# Altium PCB STM32 ONBOARD.PcbDoc (part 1 of 2)
Units mm, origin at the board's own origin, x right, y up, seen from the top; angles counter-clockwise.
Board outline 80.78 x 83.12 mm, 2 copper layers (Top Layer, Bottom Layer); 65 components, 57 nets, 280 pads, 99 vias.
Unrouted connection lines stored in the file: 49.
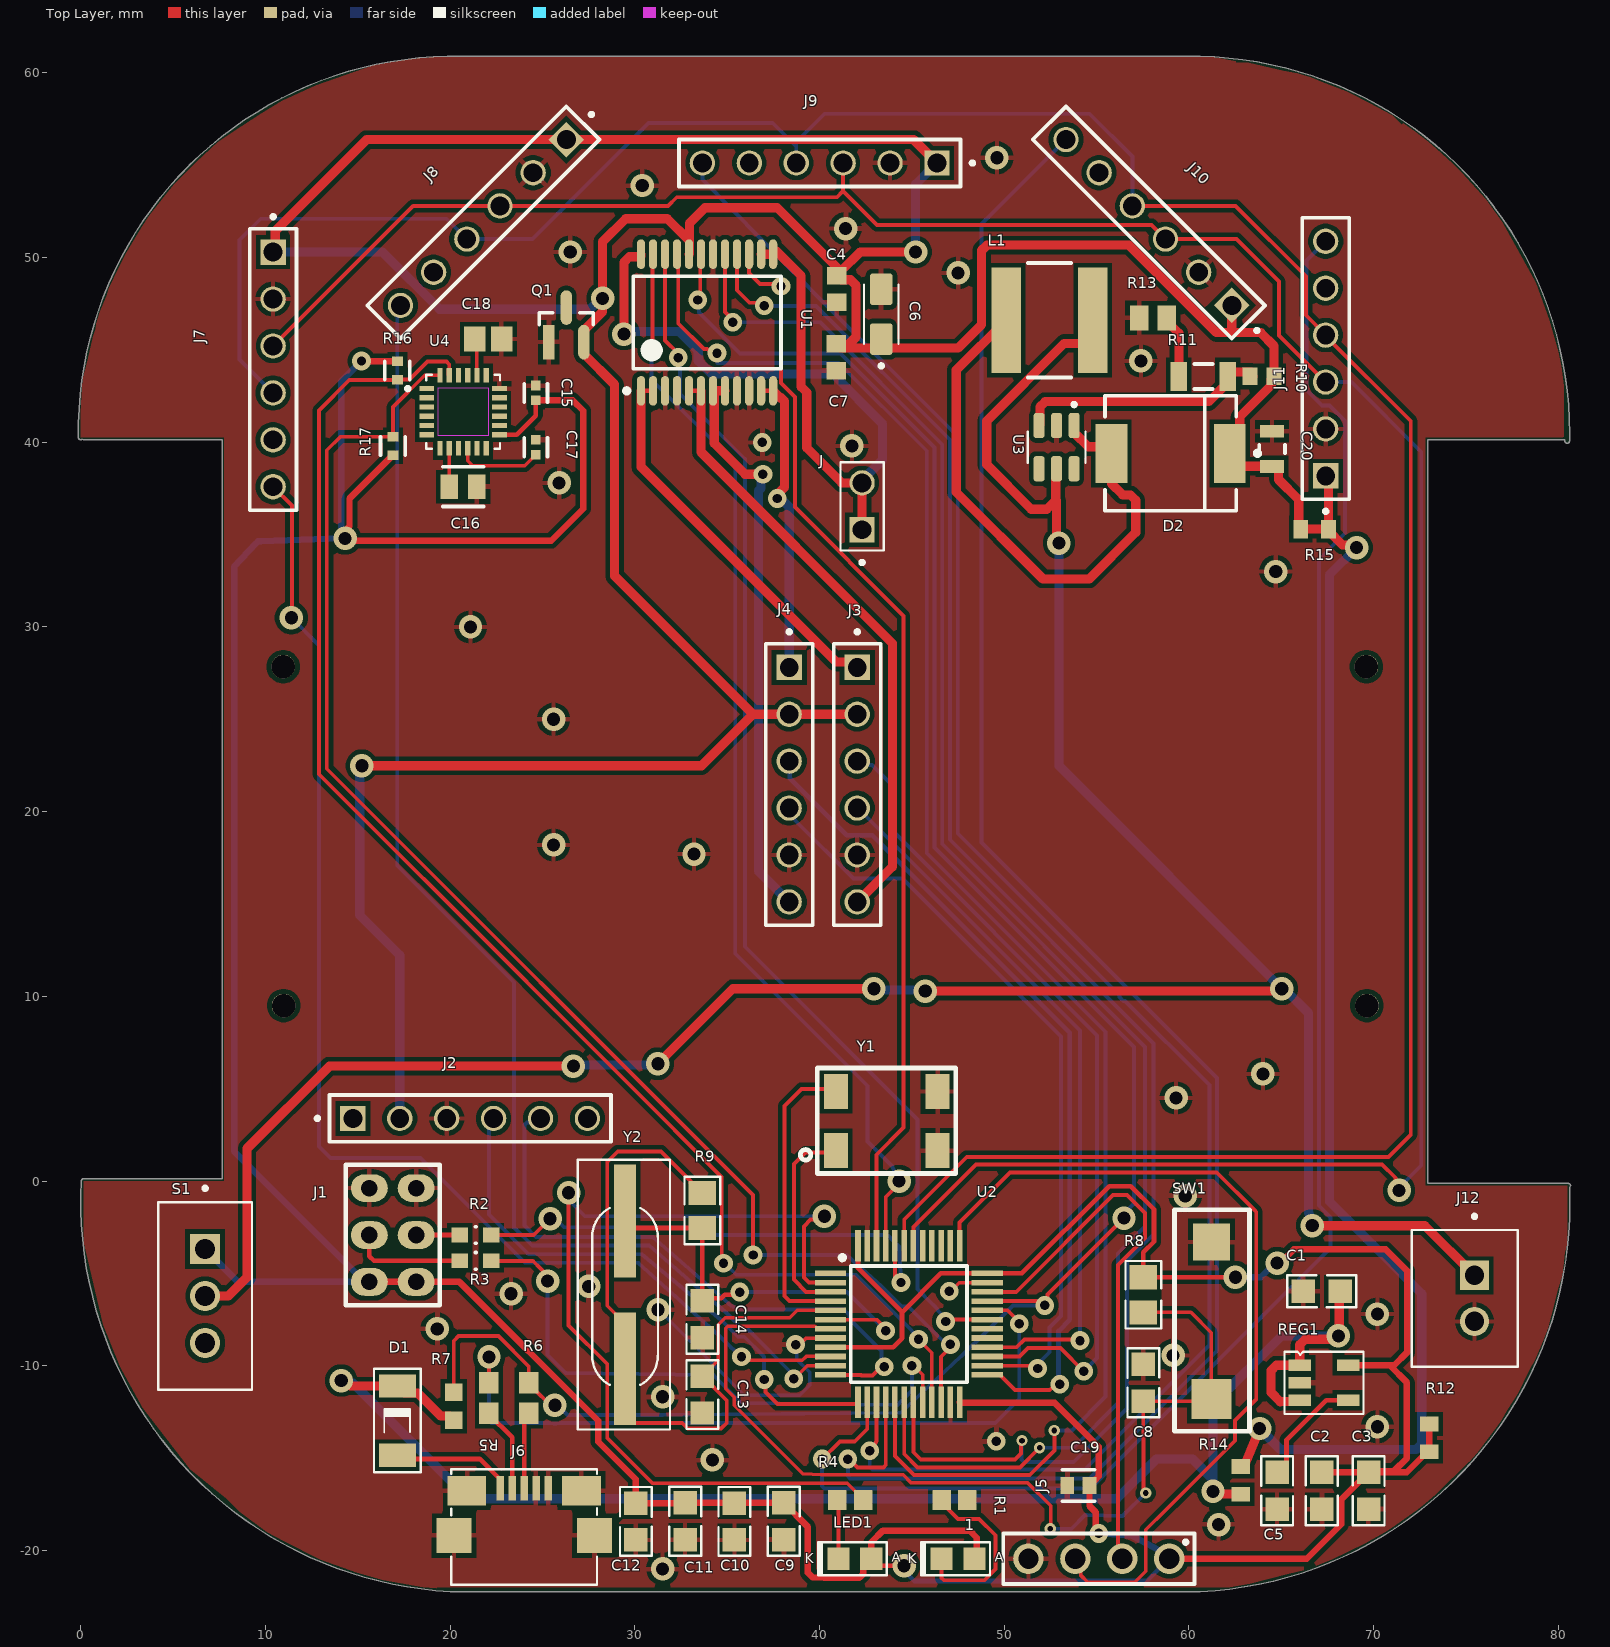
[diagram p0: Top Layer view]
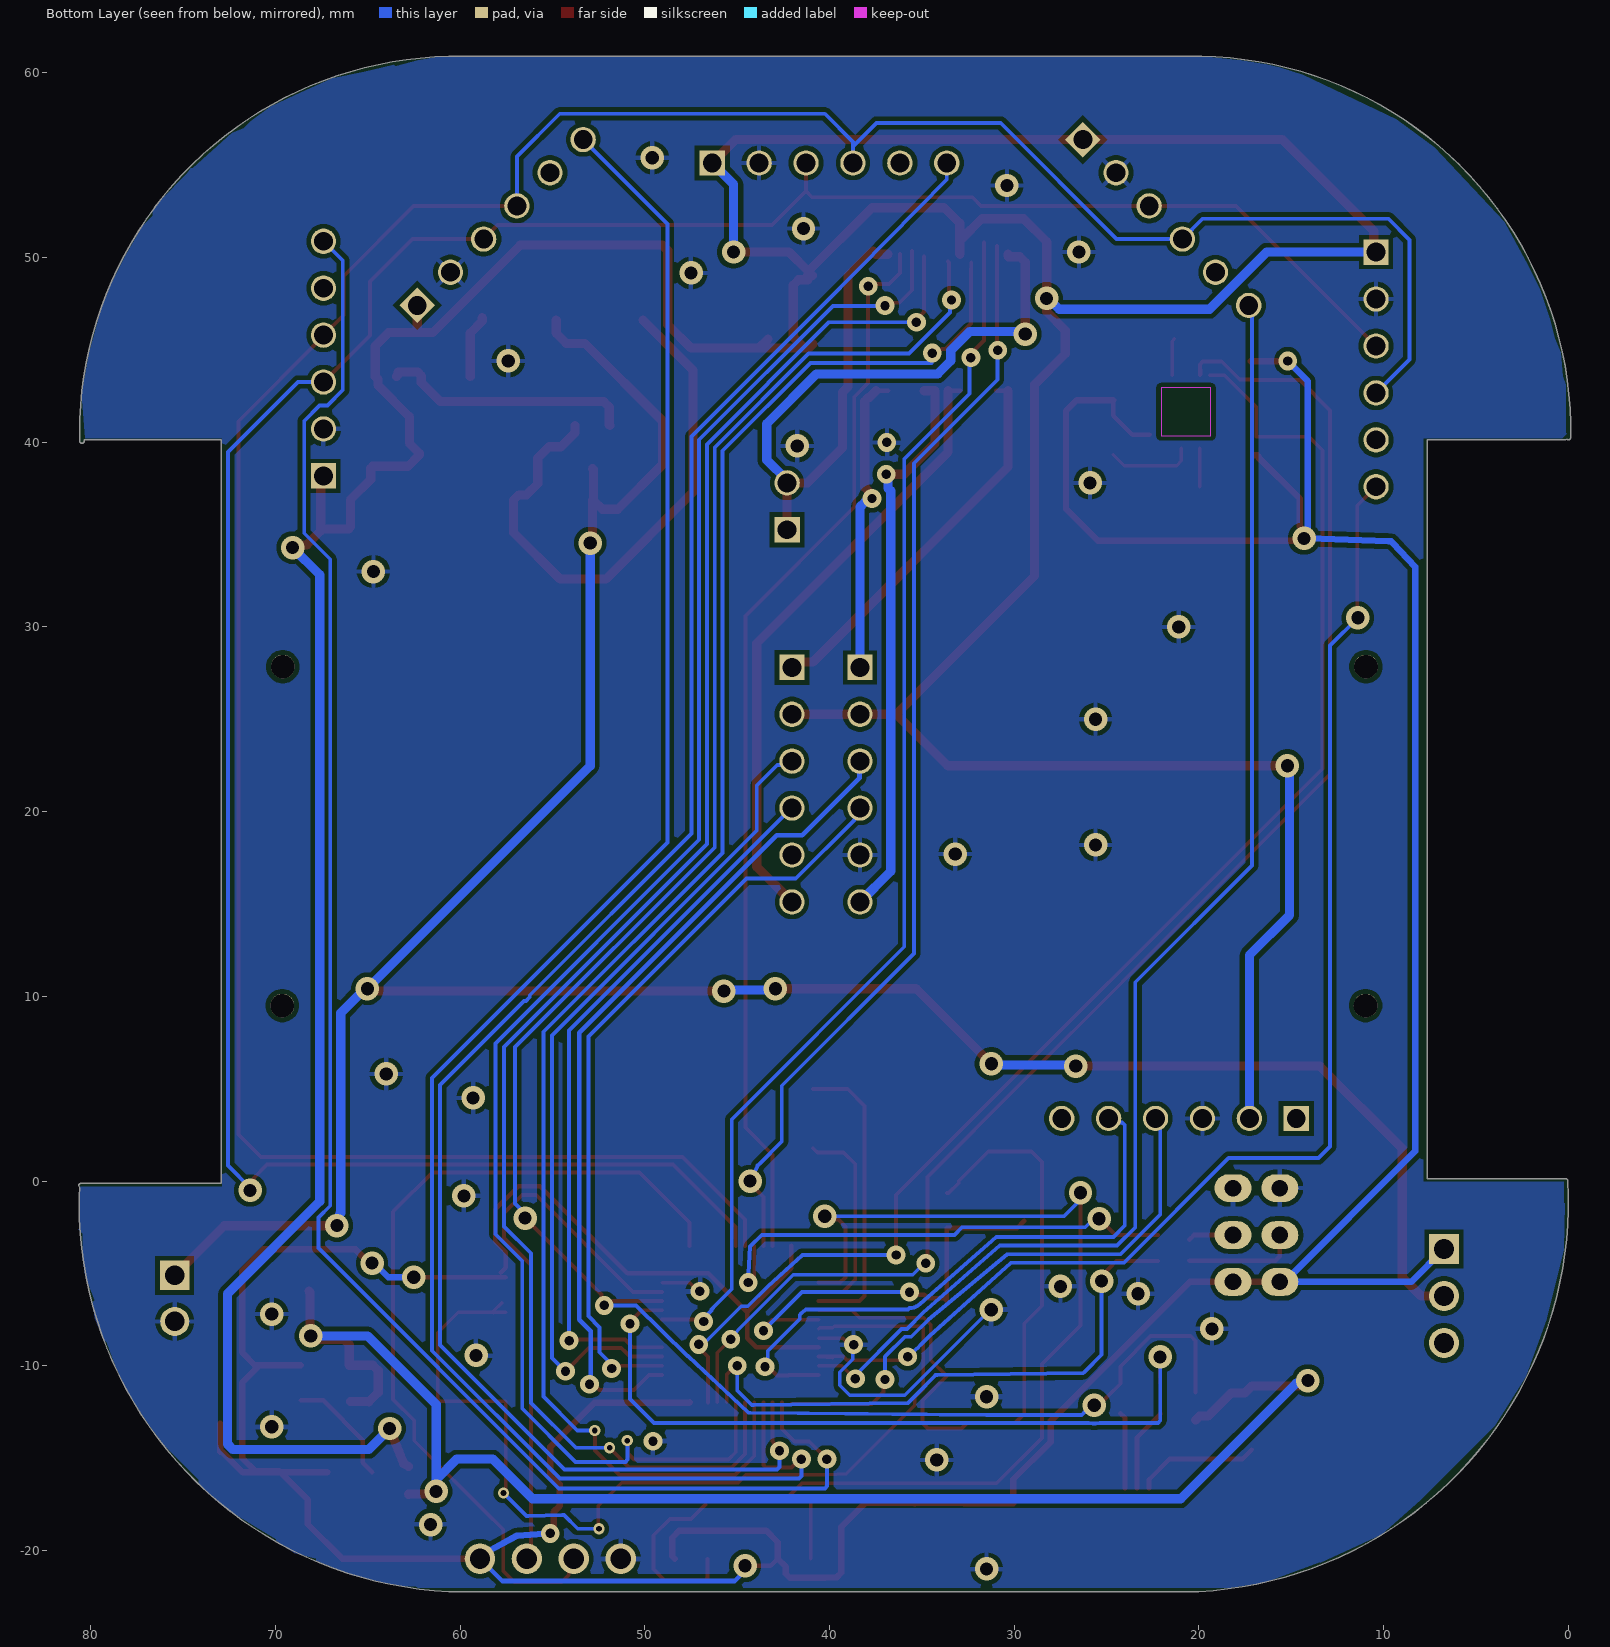
[diagram p1: Bottom Layer view, seen from below]
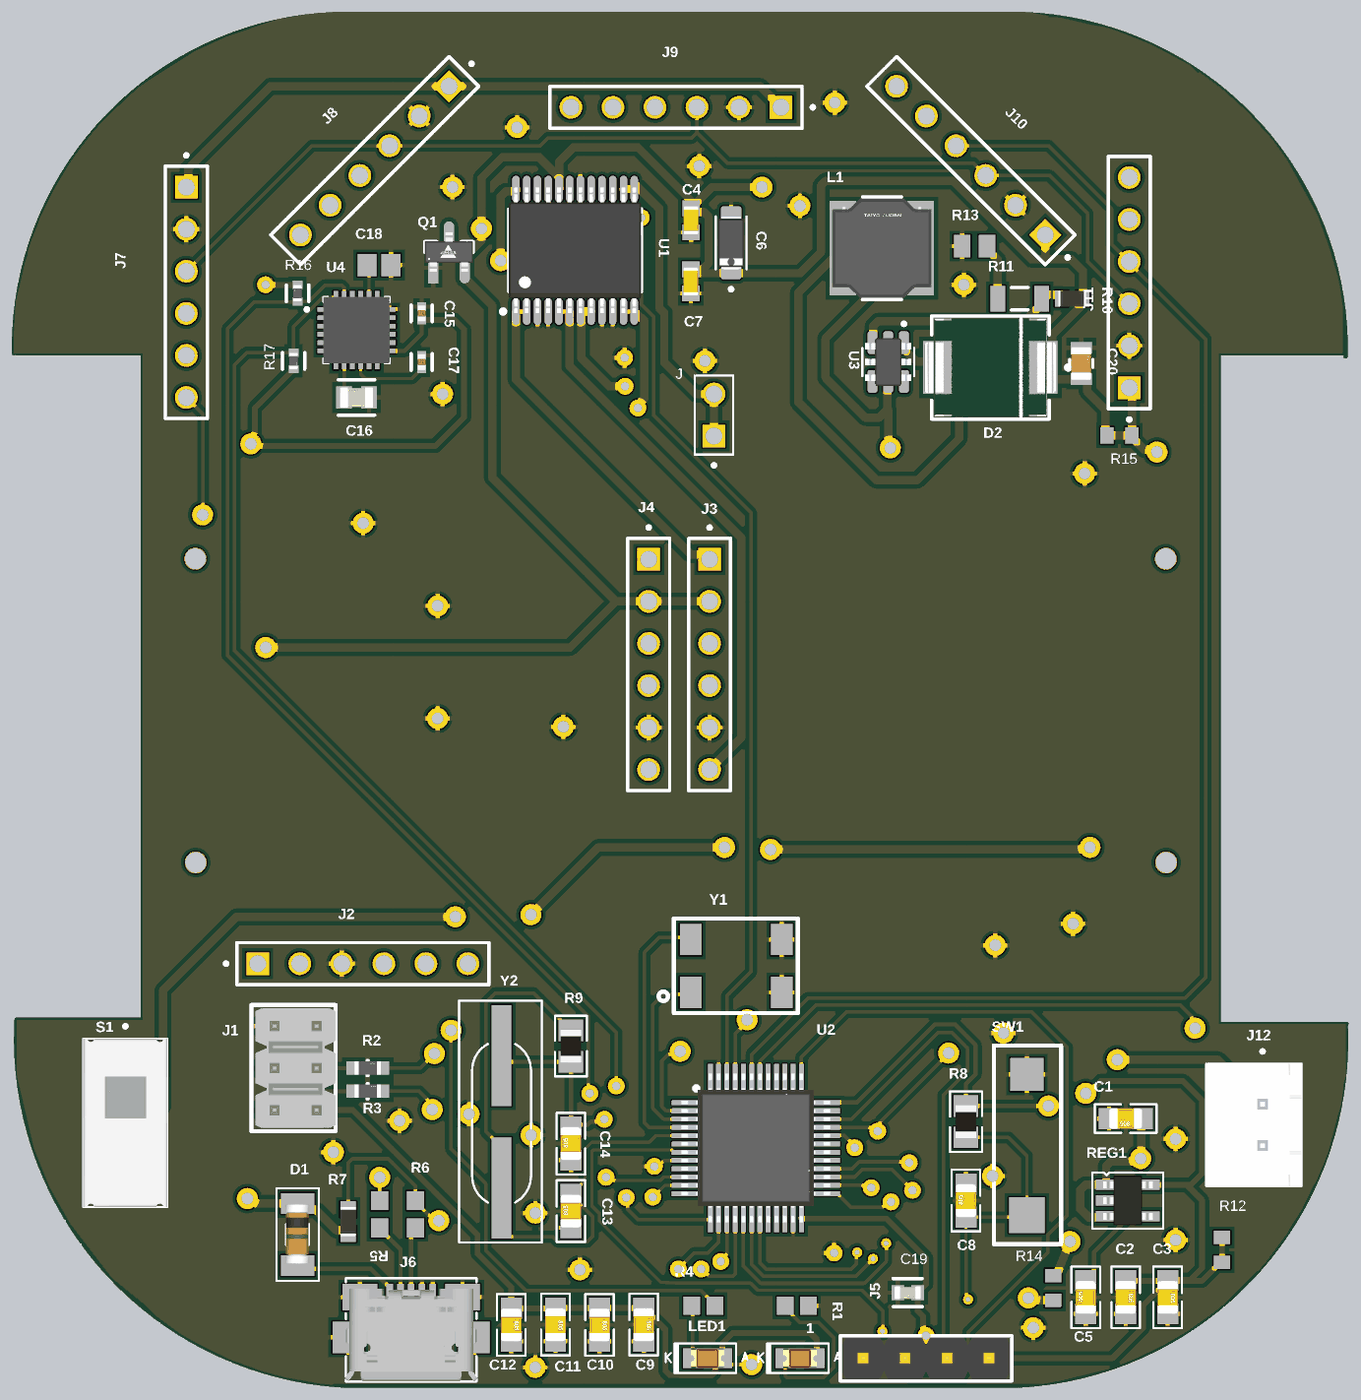
[diagram p3: 3D render of the assembled board from above, using the file's embedded part models]

## Layer stack, top to bottom
Top Solder: solder mask 0.0102, Solder Resist, Dk 3.5
Top Layer: signal copper 0.0356
Dielectric 1: dielectric 0.32, FR-4, Dk 4.8
Bottom Layer: signal copper 0.0356
Bottom Solder: solder mask 0.0102, Solder Resist, Dk 3.5

## Board outline
0.029,0.006 cw(c0.157,0) 0.157,0.127 7.649,0.127 7.649,40.131 0.157,40.131 0.078,40.158 cw(c0,40.259) -0.127,40.257 cw(c20.186,40.576) 19.866,60.889 19.868,60.889 20.024,60.889 20.034,60.889 60.609,60.889 60.611,60.889 cw(c60.199,40.484) 80.608,40.484 cw(c60.199,40.484) 80.607,40.256 cw(c60.199,40.484) 80.604,40.072 cw(c80.477,40.075) 80.349,40.077 80.35,40.13 72.928,40.13 72.928,-0.127 80.53,-0.127 cw(c80.53,-0.254) 80.657,-0.254 80.609,-0.355 cw(c59.62,-1.242) 80.627,-1.242 cw(c59.62,-1.242) 60.615,-22.226 60.609,-22.226 20.025,-22.226 20.018,-22.226 cw(c21.14,-1.115)

## Design rules (kind name [scope] priority, off if disabled: settings)
Clearance [All] p1: gap=0.254 ignorepadtopadclearanceinfootprint=FALSE except(0.1: Arc-SMDPad Track-SMDPad SMDPad-SMDPad; 0.21: Arc-Arc Arc-Track Track-Track)
HoleSize [IsVia] p1: absolutevalues=TRUE maxlimit=3 minlimit=0 maxpercent=80.000 minpercent=20.000
PolygonConnect [All] p1: connectstyle=Relief reliefconductorwidth=0.254 reliefentries=4 polygonreliefangle="90 Angle" airgapwidth=0.254
RoutingVias [All] p1: holewidth=0.711 width=1.27 viastyle="Through Hole" minholewidth=0 minwidth=0 maxholewidth=2 maxwidth=3
SolderMaskExpansion [All] p1: expansion=0.102 istentingtop=FALSE
SupplyNets "Schematic Supply Nets_4" [InNet('+3V3')] p1: voltage=0.000
SupplyNets "Schematic Supply Nets" [InNet('GND')] p2: voltage=0.000
Width Width_1 [InNet('AO1')] p1: maxlimit=0.7 minlimit=0.254 preferedwidth=0.5
Width Width_6 [InNet('AO2')] p2: maxlimit=0.7 minlimit=0.254 preferedwidth=0.5
Width Width_5 [InNet('BO1')] p3: maxlimit=0.7 minlimit=0.254 preferedwidth=0.5
Width Width_4 [InNet('BO2')] p4: maxlimit=0.7 minlimit=0.254 preferedwidth=0.5
Width Width_3 [InNet('+3V3')] p5: maxlimit=0.7 minlimit=0.254 preferedwidth=0.35
Width Width_2 [InNet('5V')] p6: maxlimit=0.7 minlimit=0.254 preferedwidth=0.5
Width [All] p7: maxlimit=0.5 minlimit=0.19 preferedwidth=0.21
29 further rules are at their usual default settings.

## Components (designator, comment, footprint, x,y, rotation, side; value= is the part's Value field where it differs from the comment)
1 "RED LED" LED_0805 47.498,-20.447 r0 top
C1 "0.1uF" CAP_0805 67.183,-5.969 r180 top
C2 "0.1uF" CAP_0805 67.183,-16.764 r270 top
C3 "0.1uF" CAP_0805 69.723,-16.764 r270 top
C4 "GRM188R71H104KA93D" CAPC1608X90X35ML10T15 40.921,48.296 r90 top
C5 "22pF" CAP_0805 64.77,-16.764 r90 top
C6 "T491A106K016AG" CAPMP3216X180N 43.339,46.933 r90 top
C7 "0,1 uf" CAPC1608X90X35ML10T15 40.9,44.6 r90 top
C8 "0.1uF" CAP_0805 57.531,-10.922 r90 top
C9 "0.1uF" CAP_0805 38.055,-18.415 r270 top
C10 "0.1uF" CAP_0805 35.388,-18.431 r270 top
C11 "0.1uF" CAP_0805 32.721,-18.415 r270 top
C12 "0.1uF" CAP_0805 30.054,-18.431 r270 top
C13 "22pF" CAP_0805 33.655,-11.557 r90 top
C14 "22pF" CAP_0805 33.655,-7.477 r90 top
C15 "0.1uf" FP-C0402-BB-MFG 24.638,42.672 r90 top value="0.10 μF"
C16 "10nF" FP-C0805C-DN-MFG 20.701,37.592 r0 top value="10,000 pF"
C17 "0.1uf" FP-C0402-BB-MFG 24.638,39.732 r90 top value="0.10 μF"
C18 "2.2nF" CAPC2013X94X50LL20T25 22.061,45.593 r0 top
C19 "C0603C104K5RACTU" FP-C0603C-CF-MFG 54.013,-16.482 r180 top value="0.10 μF"
C20 "22uF" FP-GRM21B-0_15-MFG 64.496,39.646 r90 top
D1 "Zener3" DIO_SOD80C 17.145,-12.97 r270 top
D2 "SS34-E3/57T" FP-95402-MFG 59.005,39.4 r180 top
J "3-644456-2" TE_3-644456-2 42.3,35.26 r90 top
J1 "2X3 Berg Strip" CON6_100_59D78_TH_ST_Duplicate 18.161,-5.461 r90 top
J2 "TOF 2" SAMTEC_MTSW-106-22-S-S-360 21.082,3.391 r180 top
J3 "RIGHT MOTOR" SAMTEC_MTSW-106-22-S-S-360 42.037,21.463 r90 top
J4 "LEFT MOTOR" SAMTEC_MTSW-106-22-S-S-360 38.354,21.463 r90 top
J5 "6130XX11121_61300411121" 61300411121 55.118,-20.447 r180 top
J6 "MICRO USB2.0" CON_10118192-0001LF_SMD 24.003,-17.907 r0 top
J7 "TOF 1" SAMTEC_MTSW-106-22-S-S-360 10.414,43.942 r90 top
J8 "TOF 2" SAMTEC_MTSW-106-22-S-S-360 21.799,51.898 r45 top
J9 "TOF 3" SAMTEC_MTSW-106-22-S-S-360 40.005,55.118 r0 top
J10 "TOF 4" SAMTEC_MTSW-106-22-S-S-360 57.83,51.898 r315 top
J11 "TOF 5" SAMTEC_MTSW-106-22-S-S-360 67.4,44.53 r270 top
J12 "B2B-XH-A(LF)(SN)" JST_B2B-XH-A(LF)(SN) 74.93,-6.35 r90 top
L1 "22uH" FP-NR6045-MFG 52.451,46.609 r0 top
LED1 "RED LED" LED_0805 41.91,-20.447 r0 top
Q1 "SI2337DS-T1-GE3" FP-S-03946-IPC_A 26.289,46.355 r90 top
R1 "ERA3AEB511V" RESC1608X55X30ML20T20 47.306,-17.272 r0 top
R2 "RC0603FR-07100KL" FP-RC0603-0_55-MFG 21.375,-2.921 r0 top
R3 "RC0603FR-07100KL" FP-RC0603-0_55-MFG 21.375,-4.318 r0 top
R4 "ERA3AEB511V" RESC1608X55X30ML20T20 41.656,-17.272 r0 top
R5 "20R,0603" RESC1609X55X30ML10T20 22.098,-11.748 r270 top
R6 "20R,0603" RESC1609X55X30ML10T20 24.257,-11.747 r270 top
R7 "ERJ-3EKF4701V" RESC1608X55X30NL15T15 20.193,-12.192 r90 top
R8 "10K" RES_0805 57.531,-6.157 r270 top
R9 "10Mohm" RES_0805 33.655,-1.59 r90 top
R10 "10K" RESC1609X50X30NL8T20 63.951,43.561 r0 top
R11 "1K" RESC3216X70X50LL05T20 60.778,43.561 r0 top
R12 "0R" RESC1608X55X25ML10T15 73,-13.9 r90 top
R13 "330" RESC2013X60X40LL20T25 58.051,46.736 r0 top
R14 "0R" RESC1608X55X25ML10T15 62.8,-16.2 r90 top
R15 "0R" RESC1608X55X25ML10T15 66.8,35.3 r0 top
R16 "4.7R" FP-RC0402-0_4-MFG 17.137,43.887 r90 top
R17 "4.7R" FP-RC0402-0_4-MFG 16.9,39.8 r270 top
REG1 "RT9193-33GB" SOT23-5 67.31,-10.922 r270 top
S1 "500ASSP1M2QE" SW_500ASSP1M2QE 6.731,-6.223 r270 top
SW1 "TACT SWITCH" SW_342_SMD 61.214,-3.302 r90 top
U1 "TB6612FNG" TOSH-SSOP-24_M 33.909,46.482 r90 top
U2 "STM32F103C8T6" LQFP-48_19.6_393_58X11_SMD 44.831,-7.747 r0 top
U3 "MT3608" SOT95P280X145-6N 52.832,39.735 r270 top
U4 "MPU-6050" QFN50P400X400X95-24N 20.701,41.656 r0 top
Y1 "32.768KHz" "XTAL_MC-405 32.7680K-G3" 40.894,4.851 r0 top
Y2 "8MHz" XTAL_314_240X47_SMD 29.464,-10.16 r90 top

## Footprints (in the part's own frame and the unit in brackets; to place one, negate y for a bottom-side part, rotate by r counter-clockwise, add the part's x,y. Pads: shape width x height; smd on the part's side, far side on the other; paste and mask are expansions set on the pad)
61300411121 [mm]
  round 1.65 hole 1.1: 1(-3.81,0) 2(-1.27,0) 3(1.27,0) 4(3.81,0)
  silkscreen extent -5.18,-1.37 5.18,1.37, body extent -5.08,-1.27 5.08,1.27, height 7.27
CAP_0805 [mm] "Ceramic Capacitor"
  rect 1.27x1.27 smd mask+0.076: 1(-1,0) 2(1,0)
  silkscreen extent -1.86,-0.86 1.86,0.86, body extent -1,-0.62 1,0.63, height 0.78
CAPC1608X90X35ML10T15 [mm] "Chip Capacitor, 2-Leads, Body 1.7x0.9mm, IPC Low Density"
  rect 0.95x1.05 smd: 1(-0.725,0) 2(0.725,0)
  body extent -0.85,-0.45 0.85,0.45, height 0.9
CAPC2013X94X50LL20T25 [mm] "Chip Capacitor, 2-Leads, Body 2.01x1.25mm, IPC High Density"
  rect 1.15x1.35 smd: 1(-0.725,0) 2(0.725,0)
  body extent -1.1,-0.72 1.1,0.72, height 0.94
CAPMP3216X180N [mm]
  rrect25% 1.71x1.23 smd: 1(-1.35,0) 2(1.35,0)
  silkscreen extent -2.9,-0.94 1.6,0.93, body extent -1.6,-0.8 1.6,0.8, height 1.8
CON6_100_59D78_TH_ST_Duplicate [mm] "Berg strip"
  oval 1.5x2 hole 0.9: 1(0,0) 2(0,2.54) 3(2.54,0) 4(2.54,2.54) 5(5.08,0) 6(5.08,2.54)
  silkscreen extent -1.27,-1.27 6.35,3.81, body extent -1.07,-1.27 6.15,3.56, height 8.18
CON_10118192-0001LF_SMD [mm] "USB2.0 MICRO"
  rect 0.4x1.35 smd: 1(-1.3,1.275) 2(-0.65,1.275) 3(0,1.275) 4(0.65,1.275) 5(1.3,1.275)
  rect 2.1x1.6 smd: 6(-3.1,1.15) 7(3.1,1.15)
  rect 1.9x1.9 smd: 8(-3.8,-1.275) 9(3.8,-1.275)
  silkscreen extent -3.95,-3.94 3.95,2.3, body extent -4.04,-3.94 4.04,1.66, height 2.81
DIO_SOD80C [mm] "Voltage regulator diodes"
  rect 1.25x2 smd: A(1.875,0) K(-1.875,0)
  silkscreen extent -2.8,-1.27 2.79,1.27, body extent -1.82,-0.78 1.77,0.72, height 1.5
FP-95402-MFG [mm]
  rect 1.72x3.2 smd paste+0 mask+0: 1(-3.205,0) 2(3.205,0)
  silkscreen extent -4.83,-3.11 3.55,3.11, body extent -4.17,-3.21 4.17,3.21, height 0.25
FP-C0402-BB-MFG [mm]
  rect 0.52x0.52 smd paste+0 mask+0: 1(-0.4,0) 2(0.4,0)
  silkscreen extent -0.5,-0.63 0.5,0.64, body extent -0.8,-0.4 0.8,0.4, height 0.25
FP-C0603C-CF-MFG [mm]
  rect 0.75x0.9 smd paste+0 mask+0: 1(-0.6,0) 2(0.6,0)
  silkscreen extent -0.87,-0.85 0.88,0.85, body extent -1.2,-0.6 1.2,0.6, height 0.25
FP-C0805C-DN-MFG [mm]
  rect 0.95x1.35 smd paste+0 mask+0: 1(-0.75,0) 2(0.75,0)
  silkscreen extent -1.1,-1.07 1.1,1.07, body extent -1.4,-0.85 1.4,0.85, height 0.25
FP-GRM21B-0_15-MFG [mm]
  rect 0.7x1.3 smd paste+0 mask+0: 1(-0.95,0) 2(0.95,0)
  silkscreen extent -0.22,-0.7 0.22,0.7, body extent -1.4,-0.8 1.4,0.8, height 0.25
FP-NR6045-MFG [mm]
  rect 1.6x5.7 smd paste+0 mask+0: 1(-2.35,0) 2(2.35,0)
  silkscreen extent -1.18,-3.1 1.17,3.1, body extent -3.25,-3.2 3.25,3.2, height 0.25
FP-RC0402-0_4-MFG [mm]
  rect 0.5x0.6 smd paste+0 mask+0: 1(-0.5,0) 2(0.5,0)
  silkscreen extent -0.5,-0.67 0.5,0.67, body extent -0.85,-0.4 0.85,0.4, height 0.25
FP-RC0603-0_55-MFG [mm]
  rect 0.9x0.8 smd paste+0 mask+0: 1(-0.85,0) 2(0.85,0)
  silkscreen extent -0.02,-0.45 0.03,0.45, body extent -1.4,-0.55 1.4,0.55, height 0.25
FP-S-03946-IPC_A [mm]
  rect 1.874x0.616 smd paste+0 mask+0: 1(-0.935,0.95)
  rrect100% 1.874x0.616 smd paste+0 mask+0: 2(-0.935,-0.95) 3(0.935,0)
  silkscreen extent 0,-1.46 0.65,1.46, body extent -2.37,-1.96 2.37,1.96, height 0.25
JST_B2B-XH-A(LF)(SN) [mm]
  rect 1.575x1.575 / inner round 1.575 / far side rect 1.575x1.575 hole 1.05: 1(1.25,-0.525)
  round 1.575 hole 1.05: 2(-1.25,-0.525)
  silkscreen extent -3.7,-2.88 4.54,2.87, body extent -3.7,-2.88 3.7,2.88, height 7
LED_0805 [mm] "LED"
  rect 1.2x1.2 smd mask+0.076: A(0.889,0) K(-0.889,0)
  silkscreen extent -1.99,-0.89 1.73,0.89, body extent -1.01,-0.62 1.01,0.63, height 1.1
LQFP-48_19.6_393_58X11_SMD [mm] "48LQFP"
  rect 1.7x0.3 smd mask+0.076: 1(-4.238,2.75) 2(-4.238,2.25) 3(-4.238,1.75) 4(-4.238,1.25) 5(-4.238,0.75) 6(-4.238,0.25) 7(-4.238,-0.25) 8(-4.238,-0.75) 9(-4.238,-1.25) 10(-4.238,-1.75) 11(-4.238,-2.25) 12(-4.238,-2.75) 25(4.238,-2.75) 26(4.238,-2.25) 27(4.238,-1.75) 28(4.238,-1.25) 29(4.238,-0.75) 30(4.238,-0.25) 31(4.238,0.25) 32(4.238,0.75) 33(4.238,1.25) 34(4.238,1.75) 35(4.238,2.25) 36(4.238,2.75)
  rect 0.3x1.7 smd mask+0.076: 13(-2.75,-4.238) 14(-2.25,-4.238) 15(-1.75,-4.238) 16(-1.25,-4.238) 17(-0.75,-4.238) 18(-0.25,-4.238) 19(0.25,-4.238) 20(0.75,-4.238) 21(1.25,-4.238) 22(1.75,-4.238) 23(2.25,-4.238) 24(2.75,-4.238) 37(2.75,4.238) 38(2.25,4.238) 39(1.75,4.238) 40(1.25,4.238) 41(0.75,4.238) 42(0.25,4.238) 43(-0.25,4.238) 44(-0.75,4.238) 45(-1.25,4.238) 46(-1.75,4.238) 47(-2.25,4.238) 48(-2.75,4.238)
  silkscreen extent -3.72,-3.15 3.15,3.72, body extent -4.5,-4.5 4.5,4.5, height 1.7
QFN50P400X400X95-24N [mm]
  rect 0.79x0.28 smd: 1(-1.97,1.25) 2(-1.97,0.75) 3(-1.97,0.25) 4(-1.97,-0.25) 5(-1.97,-0.75) 6(-1.97,-1.25) 13(1.97,-1.25) 14(1.97,-0.75) 15(1.97,-0.25) 16(1.97,0.25) 17(1.97,0.75) 18(1.97,1.25)
  rect 0.28x0.79 smd: 7(-1.25,-1.97) 8(-0.75,-1.97) 9(-0.25,-1.97) 10(0.25,-1.97) 11(0.75,-1.97) 12(1.25,-1.97) 19(1.25,1.97) 20(0.75,1.97) 21(0.25,1.97) 22(-0.25,1.97) 23(-0.75,1.97) 24(-1.25,1.97)
  Keep-Out Layer region: 1.35,-1.3 -1.35,-1.3 -1.35,1.3 1.35,1.3
  silkscreen extent -3.1,-2 2,2, body extent -2,-2 2,2, height 0.93
RES_0805 [mm] "Resister"
  rect 1.3x1.5 smd mask+0.076: 1(0.95,0) 2(-0.95,0)
  silkscreen extent -1.83,-0.97 1.83,0.97, body extent -1,-0.63 1,0.62, height 0.5
RESC1608X55X25ML10T15 [mm] "Chip Resistor, 2-Leads, Body 1.60x0.80mm, IPC Low Density"
  rect 0.8x1 smd: 1(-0.75,0) 2(0.75,0)
  body extent -0.85,-0.45 0.85,0.45, height 0.55
RESC1608X55X30ML20T20 [mm] "Chip Resistor, 2-Leads, Body 1.60x0.80mm, IPC Low Density"
  rect 1x1.1 smd: 1(-0.7,0) 2(0.7,0)
  body extent -0.9,-0.5 0.9,0.5, height 0.55
RESC1608X55X30NL15T15 [mm] "Chip Resistor, 2-Leads, Body 1.75x0.95mm, IPC Medium Density"
  rect 0.95x0.95 smd: 1(-0.75,0) 2(0.75,0)
  body extent -0.87,-0.48 0.87,0.48, height 0.55
RESC1609X50X30NL8T20 [mm] "Chip Resistor, 2-Leads, Body 1.65x0.95mm, IPC Medium Density"
  rect 0.8x0.95 smd: 1(-0.65,0) 2(0.65,0)
  body extent -0.82,-0.48 0.82,0.48, height 0.5
RESC1609X55X30ML10T20 [mm] "Chip Resistor, 2-Leads, Body 1.60x0.85mm, IPC Low Density"
  rect 1.15x1.05 smd: 1(-0.825,0) 2(0.825,0)
  body extent -0.85,-0.48 0.85,0.48, height 0.55
RESC2013X60X40LL20T25 [mm] "Chip Resistor, 2-Leads, Body 2.00x1.25mm, IPC High Density"
  rect 1x1.35 smd: 1(-0.75,0) 2(0.75,0)
  body extent -1.1,-0.72 1.1,0.72, height 0.6
RESC3216X70X50LL05T20 [mm] "Chip Resistor, 2-Leads, Body 3.20x1.60mm, IPC High Density"
  rect 0.9x1.55 smd: 1(-1.325,0) 2(1.325,0)
  silkscreen extent -0.5,-0.67 0.5,0.67, body extent -1.63,-0.82 1.62,0.82, height 0.7
SAMTEC_MTSW-106-22-S-S-360 [mm]
  rect 1.37x1.37 / inner round 1.37 / far side rect 1.37x1.37 hole 1.02: 01(6.35,0)
  round 1.37 hole 1.02: 02(3.81,0) 03(1.27,0) 04(-1.27,0) 05(-3.81,0) 06(-6.35,0)
  silkscreen extent -7.62,-1.27 8.37,1.27
SOT23-5 [mm] "CASE: SOT"
  rect 0.62x1.22 smd mask+0.076: 1(-0.953,-1.31) 2(-0.003,-1.31) 3(0.947,-1.31) 4(0.952,1.31) 5(-0.953,1.31)
  silkscreen extent -1.69,-2.14 1.69,2.14, body extent -1.5,-1.5 1.5,1.5, height 1.41
SOT95P280X145-6N [mm]
  rrect50% 1.37x0.59 smd: 1(-1.17,0.95) 2(-1.17,0) 3(-1.17,-0.95) 4(1.17,-0.95) 5(1.17,0) 6(1.17,0.95)
  silkscreen extent -2.4,-1.57 0.85,1.56, body extent -1.45,-1.4 1.45,1.4, height 1.45
SW_342_SMD [mm] "CASE: SMD"
  rect 2x2 smd: 1(0,0)
  rect 2.15x2.15 smd: 2(-8.5,0)
  silkscreen extent -10.25,-2.06 1.75,2, body extent -7.17,-1.79 -1.17,1.71, height 2.4
SW_500ASSP1M2QE [mm]
  rect 1.635x1.635 / inner round 1.635 / far side rect 1.635x1.635 hole 1.09: 1(-2.54,0)
  round 1.635 hole 1.09: 2(0,0) 3(2.54,0)
  silkscreen extent -5.93,-2.54 5.08,2.54, body extent -5.08,-2.54 5.08,2.54, height 13.32
TE_3-644456-2 [mm]
  rect 1.37x1.37 hole 1.02: 1(0,0)
  round 1.37 hole 1.02: 2(2.54,0)
  silkscreen extent -1.87,-1.17 3.66,1.17
TOSH-SSOP-24_M [mm] "SOP, 24-Leads, Body 8x5.8mm, Pitch 0.65mm, IPC Low Density"
  oval 1.6x0.45 smd: 1(-3.7,3.575) 2(-3.7,2.925) 3(-3.7,2.275) 4(-3.7,1.625) 5(-3.7,0.975) 6(-3.7,0.325) 7(-3.7,-0.325) 8(-3.7,-0.975) 9(-3.7,-1.625) 10(-3.7,-2.275) 11(-3.7,-2.925) 12(-3.7,-3.575) 13(3.7,-3.575) 14(3.7,-2.925) 15(3.7,-2.275) 16(3.7,-1.625) 17(3.7,-0.975) 18(3.7,-0.325) 19(3.7,0.325) 20(3.7,0.975) 21(3.7,1.625) 22(3.7,2.275) 23(3.7,2.925) 24(3.7,3.575)
  silkscreen extent -3.82,-4 2.5,4.47, body extent -3.8,-4 3.8,4, height 1.6
XTAL_314_240X47_SMD [mm] "CASE: TH"
  rect 6.096x1.2 smd: 1(0,0) 2(8,0)
  silkscreen extent -3.29,-2.44 11.32,2.57, body extent -2.99,-2.27 10.9,2.41, height 3.05
"XTAL_MC-405 32.7680K-G3" [mm] "Crystal"
  rect 1.3x1.9 smd: 1(0,-3.2) 2(5.5,-3.2) 3(5.5,0) 4(0,0)
  silkscreen extent -1.93,-4.45 6.48,1.27, body extent -1.02,-4.44 6.48,1.27, height 3.6

## Part data
1 LED1: library part LED-RED_10mA-0805, "Red 621nm LED Indication - Discrete 2V 0805 (2012 Metric)", Case/ Package=0805, Manufacturer="Lite-On Inc.", Manufacturer Part Number=LTST-C170EKT, Supplier Part Number-1=160-1178-1-ND, Supplier-1=Digikey
C1 C2 C3 C8 C9 C10 C11 C12: library part CAP_0.1uF-50V-5%-0805, "0.1µF ±5% 50V Ceramic Capacitor X7R 0805 (2012 Metric)", Case/Package="0805 (2012 Metric)", Manufacturer=KEMET, Manufacturing Part Number=C0805C104J5RACTU, Supplier Part Number-1=399-1171-1-ND, Supplier-1=Digikey
C4 C7: library part CMP-2100-03643-1, "Chip Capacitor, 0.1 uF, +/- 10%, 50 V, -55 to 125 degC, 0603 (1608 Metric), RoHS, Tape and Reel", Capacitance=100nF, Case Code (Imperial)=0603, Case Code (Metric)=1608, Dielectric=X7R, Dielectric Material=Ceramic, Insulation Resistance=10GR, Manufacturer=Murata, Max Operating Temperature=125degC, Min Operating Temperature=-55degC, Package Description="2-Pin Surface Mount Device, Body 1.6 x 0.8 mm", Package Quantity=1, Tolerance=10%, Voltage=50V, Case/Package=0603, Contact Plating=Tin, Datasheet URL=http://psearch.en.murata.com/capacitor/product/GRM188R71H104KA93%23.pdf, Datasheet Version=42675.0, Depth=0.8mm, Height=0.8mm, Lead Free=LeadFree, Length=1.6mm, Manufacturer URL=http://www.murata.com/, Material=Ceramic, Mount=SurfaceMount, Number of Pins=2, Package Reference=0603, Packaging=TapeandReel, Radiation Hardening=No, REACH SVHC=NoSVHC, RoHSCompliant=true, Termination=SMD/SMT, Thickness=0.035inch, Voltage Rating=50V, Voltage Rating (DC)=50V, Width=0.8mm
C5 C13 C14: library part CAP_22pF-50V-5%-0805, "22pF ±5% 50V Ceramic Capacitor C0G, NP0 0805 (2012 Metric)", Case/Package=0805, Manufacturer=KEMET, Manufacturer Part Number=C0805C220J5GACTU, Supplier Part Number-1=399-1113-1-ND, Supplier-1=Digikey
C6: "10ÂµF Molded Tantalum Capacitors 16V 1206 (3216 Metric) 3Ohm", Package="1206 KEMET", Availability=Warning, Check_prices=https://www.snapeda.com/parts/T491A106K016AG/KEMET/view-part/1691630/?ref=eda, MF=KEMET, MP=T491A106K016AG, Price=None, Purchase-URL=https://pricing.snapeda.com/search/part/T491A106K016AG/?ref=eda, SnapEDA_Link=https://www.snapeda.com/parts/T491A106K016AG/KEMET/view-part/1691630/?ref=snap
C15 C17: library part CMP-2008-02108-2, "CAP CER 0.1UF 16V X7R 0402", Capacitance="0.10 μF", Manufacturer=Kemet, Manufacturer Part Number=C0402C104K4RACTU, Package=C0402-BB, Temperature="-55°C to +125°C", Temperature Characteristic=X7R, Temperature Coefficient=15%, Temperature Range High=+125°C, Temperature Range Low=-55°C, Tolerance=0.1, Voltage Rating="16 V", Automotive=No, Category=Cap, ComponentLink2Description=Datasheet, ComponentLink2URL=https://content.kemet.com/datasheets/KEM_C1002_X7R_SMD.pdf, Device Class L1="Passive Components", Device Class L2=Capacitors, Device Class L3="Ceramic Capacitors", Digikey Description="CAP CER 0.1UF 16V X7R 0402", Height=0.55mm, Ipc Land Pattern Name=CAPC10050X50, Lead Free=Yes, Material=Ceramic, Mouser Description="Cap Ceramic 0.1uF 16V X7R 10% SMD 0402 125?C Paper T/R - Tape and Reel (Alt: C0402C104K4RAC TU)", Octopart=https://octopart.com/c0402c104k4ractu-kemet-94158, RoHS=TRUE
C16: library part CMP-2007-00259-2, "CAP CER 10000PF 200V X7R 0805", Capacitance="10,000 pF", Manufacturer=KEMET, Manufacturer Part Number=C0805C103K2RACTU, Package=C0805C-DN, Temperature="-55°C to +125°C", Temperature Characteristic=X7R, Temperature Coefficient=30ppm/°C, Temperature Range High=+125°C, Temperature Range Low=-55°C, Tolerance=0.1, Voltage Rating="200 V", Automotive=No, Category=Cap, ComponentLink2Description=Datasheet, ComponentLink2URL=https://content.kemet.com/datasheets/KEM_C1003_C0G_SMD.pdf, Device Class L1="Passive Components", Device Class L2=Capacitors, Device Class L3="Ceramic Capacitors", Digikey Description="CAP CER 10000PF 200V X7R 0805", Height=0.88mm, Ipc Land Pattern Name=CAPC200125X78, Lead Free=Yes, Material=Ceramic, Mouser Description="KEMET - C0805C103K2RACTU - CAP, MLCC, X7R, 10NF, 200V, 0805", Octopart=https://octopart.com/c0805c103k2ractu-kemet-9138347, RoHS=TRUE
C18: library part CMP-2007-04184-1, Manufacturer="AVX Interconnect / Elco", Part Number=08051C222JAT2A
C19: library part CMP-2006-03061-2, "CAP CER 0.1UF 50V X7R 0603", Capacitance="0.10 μF", Manufacturer=KEMET, Package=C0603C-CF, Temperature="-55°C to +125°C", Temperature Characteristic=X7R, Temperature Coefficient=30ppm/°C, Temperature Range High=+125°C, Temperature Range Low=-55°C, Tolerance=0.1, Voltage Rating="50 V", Automotive=Yes, Automotive Grade="Grade 1", Category=Cap, ComponentLink2Description=Datasheet, ComponentLink2URL=https://api.kemet.com/component-edge/download/datasheet/C0603C100J5GACAUTO.pdf, Device Class L1="Passive Components", Device Class L2=Capacitors, Device Class L3="Ceramic Capacitors", Digikey Description="CAP CER 0.1UF 50V X7R 0603", Height=0.87mm, Lead Free=Yes, Manufacturer Part Number=C0603C104K5RACTU, Material=Ceramic, Octopart=https://octopart.com/c0603c104k5ractu-kemet-139244, RoHS=TRUE
C20: library part CMP-2007-03385-2, "Chip Multilayer Ceramic Capacitors for General Purpose, 0805, 22uF, X5R, 15%, 20%, 6.3V", Case Code (Imperial)=0805, Case Code (Metric)=2012, Dielectric=X5R, Max Operating Temperature=85°C, Min Operating Temperature=-55°C, Package Quantity=1, Tolerance=20%, Voltage=6.3V, Capacitance=22uF, Case/Package=0805, Depth=1.25mm, Height=1.25mm, Lead Free="Lead Free", Length=2mm, Material=Ceramic, Mount="Surface Mount", Packaging="Tape and Reel", Radiation Hardening=No, REACH SVHC="No SVHC", Termination=SMD/SMT, Thickness=0.053inch, Voltage Rating=6.3V, Voltage Rating (DC)=6.3V, Width=0.049inch
D1: library part DIO-Z_3.3V-0.5W-SOD80C, "Zener Diode 3.3V 500mW ±5% Surface Mount LLDS; MiniMelf", Case/Package=SOD80C, Manufacturer="Nexperia USA Inc.", Manufacturing Part Number=BZV55-C3V3,115, Supplier Part Number-1=1727-4970-1-ND, Supplier-1=Digikey
D2: library part CMP-02539-000012-1, "DIODE SCHOTTKY 40V 3A DO214AB", Forward Current=3A, Manufacturer=Vishay, Max Junction Temp=+150°C, Max Repetitive Reverse Voltage=40V, Max Surge Forward Current=100A, Package=95402, Peak Reverse Current=0.5mA, Temperature="-55°C to +150°C", Temperature Range Low=-55°C, Automotive=No, Category=Diode, ComponentLink2Description=Datasheet, ComponentLink2URL=http://www.vishay.com/docs/88751/ss32.pdf, Device Class L1="Discrete Semiconductors", Device Class L2=Diodes, Device Class L3="Schottky Diodes", Digikey Description="DIODE SCHOTTKY 40V 3A DO214AB", Footprint Url=http://www.vishay.com/docs/95402/smc.pdf, Height=2.62mm, Lead Free=Yes, Manufacturer Part Number=SS34-E3/57T, Mouser Description="Schottky Diodes & Rectifiers 3.0 Amp 40 Volt", Octopart=https://octopart.com/ss34-e3%2F57t-vishay-39552907, RoHS=TRUE, Standoff Height=0mm, Temperature Range High=+150°C
J: "Connector Unshrouded Header HDR 2 Position 2.54mm Solder Straight Thru-Hole", Package=None, Centerline_Pitch="2.54 mm[.1 in]", Digi-Key_Part_Number=A31112-ND, Digi-Key_Purchase_URL=https://www.digikey.com/product-detail/en/te-connectivity-amp-connectors/3-644456-2/A31112-ND/698344?utm_source=snapeda&utm_medium=aggregator&utm_campaign=symbol, EU_RoHS_Compliance=Compliant, MF="TE Connectivity", MP=3-644456-2, Number_of_Positions=2, Product_Type=Connector, SnapEDA_Link=https://www.snapeda.com/parts/3-644456-2/TE%20Connectivity%20AMP%20Connectors/view-part/520887/?ref=snap, TE_purchase_URL=https://www.te.com/usa-en/product-3-644456-2.html?te_bu=Cor&te_type=disp&te_campaign=seda_glo_cor-seda-global-disp-prtnr-fy19-seda-model-bom-cta_sma-317_1&elqCampaignId=32493
J1: library part CON-BS-PLG_2X3-100-TH-ST, "6 pin, 2 row, 2.54mm pitch bergstrip", Case/Package=TH, Manufacturer=NA, Manufacturer Part Number=NA, Supplier Part Number-1=NA, Supplier-1=NA
J2 J3 J4 J7 J8 J9 J10 J11: library part MTSW-106-22-S-S-360, Package=None, Availability=Unavailable, MP=MTSW-106-22-S-S-360, Price=None
J5: "4 pins, 1 row, straight, gold plating", Package=None, Check_prices=https://www.snapeda.com/parts/61300411121/Wurth+Electronics/view-part/?ref=eda, MF="Wurth Electronics", MP=61300411121, SnapEDA_Link=https://www.snapeda.com/parts/61300411121/Wurth+Electronics/view-part/?ref=snap
J6: library part CON-USB_10118192-0002LF-SMD, "USB - micro B USB 2.0 Receptacle Connector 5 Position Surface Mount, Right Angle", Case/Package=SMD, Manufacturer="Amphenol ICC (FCI)", Manufacturing Part Number=10118192-0002LF, Supplier Part Number-1=609-5379-1-ND, Supplier-1=Digikey
J12: "Connector Header Through Hole 2 position 0.098 (2.50mm)", Package=None, Check_prices=https://www.snapeda.com/parts/B2B-XH-A(LF)(SN)/JST+Sales+America+Inc./view-part/?ref=eda, MF="JST Sales America Inc.", MP=B2B-XH-A(LF)(SN), SnapEDA_Link=https://www.snapeda.com/parts/B2B-XH-A(LF)(SN)/JST+Sales+America+Inc./view-part/?ref=snap
L1: library part CMP-14484-000872-1, "Shielded Wirewound Inductor 22uH 20% 1.5A 0.1495Ω SMD", Case/Package=Nonstandard, Current Rating=1.5A, DC Resistance (DCR)=149.5mR, Inductance tolerance=20%, Max Operating Temperature=120°C, Min Operating Temperature=-25°C, Package Quantity=1500, Resistor Type=Wirewound, Saturation Current=1.9A, Self Resonant Frequency=7MHz, Test Frequency=100kHz, Core Material=Ferrite, Halogen Free="Halogen Free", Height=4.5mm, Height - Seated (Max)=0.177inch, Inductance=22uH, Length=0.236inch, Max DC Current=1.5A, Mount="Surface Mount", Number of Pins=2, Packaging="Tape and Reel", RMS Current (Irms)=1.5A, RoHS Compliant=Yes, Series=NR, Shielding=Shielded, Termination=SMD/SMT, Tolerance=20%, Width=0.236inch
Q1: library part CMP-02550-000312-1, "MOSFET P-CH 80V 2.2A SOT23-3", Case/Package=SOT-23-3, Continuous Drain Current (ID)=1.2A, Drain to Source Breakdown Voltage=-80V, Drain to Source Resistance=270mR, Drain-source On Resistance-Max=270MR, Gate to Source Voltage (Vgs)=20V, Input Capacitance=500pF, Max Operating Temperature=150°C, Max Power Dissipation=760mW, Min Operating Temperature=-55°C, Package Quantity=1, Threshold Voltage=-4V, Contact Plating=Tin, Drain to Source Voltage (Vdss)=-80V, Element Configuration=Single, Fall Time=12ns, Height=1.02mm, Lead Free="Lead Free", Length=3.04mm, Mount="Surface Mount", Nominal Vgs=-4V, Number of Channels=1, Number of Elements=1, Number of Pins=3, On-State Resistance=270MR, Packaging="Tape and Reel", Polarity=P-CHANNEL, Power Dissipation=760mW, Radiation Hardening=No, Rds On Max=270mR, Reach SVHC Compliant=Yes, Rise Time=18ns, RoHS Compliant=Yes, Series=TrenchFET®, Turn-Off Delay Time=20ns, Turn-On Delay Time=15ns, Weight=0.050717oz, Width=1.4mm
R1 R4: library part CMP-2000-00084-1, Manufacturer=Panasonic, Part Number=ERA3AEB511V
R2 R3: library part CMP-2100-03662-2, "RES SMD 100K OHM 1% 1/10W 0603", Case Code (Imperial)=0603, Case Code (Metric)=1608, Max Operating Temperature=155°C, Max Power Dissipation=100mW, Min Operating Temperature=-55°C, Resistance=100kR, Resistance Tolerance=1%, Resistor Type="Thick Film", Temperature Coefficient=100ppm/°C, Voltage Rating=50V, Working Voltage=75V, Case/Package=0603, Construction=Rectangular, Depth=0.8mm, Features="Moisture Resistant", Height=0.45mm, Lead Free="Lead Free", Length=1.6mm, Military Standard=Not, Number of Pins=2, Number of Terminations=2, Packaging="Tape and Reel", Power Rating=100mW, REACH SVHC="No SVHC", RoHS Compliant=Yes, Series=RC, Technology="THICK FILM", Termination=SMD/SMT, Tolerance=1%, Voltage Rating (DC)=50V, Width=0.8mm
R5 R6: library part CMP-2000-03731-1, Manufacturer="Vishay Dale", Part Number=TNPW060320R0BEEA
R7: library part CMP-1012-00586-3, "Precision Thick Film Chip Resistor, 4.7 KOhm, +/- 1%, -55 to 155 degC, 0603 (1608 Metric), RoHS, Tape and Reel", Case Code (Imperial)=1206, Case Code (Metric)=3216, Case\Package=1205, Max Operating Temperature="125 degC", Min Operating Temperature="-55 degC", Package Quantity=1, Power Rating="250 mW", Resistance="220 Ohm", Tolerance=5%, Type (Resistor)="Thick Film", Voltage Rating="50 V", ComponentLink1Description="Manufacturer URL", ComponentLink1URL=http://www.panasonic.com/, ComponentLink2Description=Datasheet, ComponentLink2URL=http://industrial.panasonic.com/cdbs/www-data/pdf/RDA0000/AOA0000C86.pdf, DatasheetVersion=Apr-15, Elements=4, Height="0.024 inch", Length="0.126 inch", Mount="Surface Mount", PackageDescription="2-Pin Surface Mount Device, Body 1.6 x 0.85 mm", PackageReference=0603, Packaging="Tape and Reel", Pins=8, Radiation Hardening=No, REACH SVHC="No SVHC", RoHSCompliant=true, Width="0.063 inch"
R8: library part RES_10K-0.125W-1%-0805, "10 kOhms ±1% 0.125W, 1/8W Chip Resistor 0805 (2012 Metric) Moisture Resistant Thick Film", Case/Package=0805, Manufacturer=Yageo, Manufacturing Part Number=RC0805FR-0710KL, Supplier Part Number-1=311-10.0KCRCT-ND, Supplier-1=Digikey
R9: library part RES_10MOHM-0.125W-1%-0805, "10 MOhms ±1% 0.125W, 1/8W Chip Resistor 0805 (2012 Metric) Automotive AEC-Q200, High Voltage Thick Film", Case/Package="0805 (2012 Metric)", Manufacturer="Rohm Semiconductor", Manufacturing Part Number=KTR10EZPF1005, Supplier Part Number-1=RHM10.0MAHCT-ND, Supplier-1=Digikey
R10: library part CMP-1666-00005-4, "Chip Resistor, 10 KOhm, +/- 1%, 100 mW, -55 to 155 degC, 0603 (1608 Metric), RoHS, Tape and Reel", Manufacturer="Vishay Semiconductor", Max Operating Temperature="155 degC", Min Operating Temperature="-55 degC", Package Quantity=5000, Voltage Rating="75 V", ComponentLink1Description="Manufacturer URL", ComponentLink1URL=http://www.vishay.com/, ComponentLink2Description=Datasheet, ComponentLink2URL=https://datasheet.ciiva.com/11809/0900766b80d98afc-11809037.pdf, DatasheetVersion=06/2012, Height="0.45 mm", Length="1.55 mm", Mounting Technology="Surface Mount", PackageDescription="2-Pin Surface Mount Device, Body 1.575 x 0.85 mm", PackageReference=0603, Packaging="Tape and Reel", REACH SVHC=Unknown, RoHSCompliant=true
R11: library part CMP-2003-00017-1, Manufacturer=Panasonic, Part Number=ERJ-8ENF1001V
R12 R14 R15: library part CMP-2100-03667-1, "Chip Resistor, 0 Ohm, +/- 5%, 0.1 W, -55 to 155 degC, 0603 (1608 Metric), RoHS, Tape and Reel", Case Code (Imperial)=0603, Case Code (Metric)=1608, Manufacturer=Yageo, Max Operating Temperature=155degC, Min Operating Temperature=-55degC, Package Description="2-Pin Surface Mount Device, Body 1.6 x 0.8 mm", Package Quantity=5000, Power Rating=100mW, Resistance=0mOhm, Temperature Coefficient=200ppm/degreesC, Tolerance=5%, Voltage Rating=50V, Case/Package=0603, Composition=ThickFilm, Contact Plating=Tin, Datasheet URL=http://www.yageo.com/NewPortal/yageodocoutput?fileName=/pdf/R-Chip/PYu-RC_Group_51_RoHS_L_5.pdf, Datasheet Version="Rev. 5, 10/2016", Depth=0.8mm, Height=0.45mm, Lead Free=LeadFree, Length=1.6mm, Manufacturer URL=http://www.yageo.com/, Military Standard=Not, Number of Pins=2, Package Reference=0603, Packaging=TapeandReel, Radiation Hardening=No, REACH SVHC=NoSVHC, RoHSCompliant=true, Termination=SMD/SMT, Voltage Rating (DC)=50V, Width=0.8mm
R13: library part CMP-2001-00628-1, Manufacturer=Panasonic, Part Number=ERA6AEB331V
R16 R17: library part CMP-2002-08011-2, Case Code (Imperial)=0402, Max Operating Temperature=155°C, Max Power Dissipation=63mW, Min Operating Temperature=-55°C, Resistance=4.7kΩ, Temperature Coefficient=100ppm/°C, Tolerance=5%, Voltage Rating=50V, Case/Package=0402, Composition="Thick Film", Depth=500µm, Features="Moisture Resistant", Height=350µm, Lead Free="Lead Free", Length=1mm, Military Standard=Not, Number of Pins=2, Number of Terminations=2, Packaging="Tape & Reel", Power Rating=63mW, REACH SVHC="No SVHC", RoHS=Compliant, Schedule B="8533210045, 8533210045", Termination=SMD/SMT, Voltage Rating (AC)=50V, Voltage Rating (DC)=50V, Width=500µm
REG1: library part REG_3.3V-5.5V-0.3A-SOT-23-5, "Linear Voltage Regulator IC 1 Output 300mA SOT-23-5", Case/ Package=SOT-23-5, Manufacturer="Richtek USA Inc.", Supplier Part Number-1=1028-1014-1-ND, Manufacturer Part Number=RT9193-33GB, Supplier-1=Digikey
S1: "1P2T Sub-miniature Slide Switch", Package=None, Availability="In Stock", Check_prices=https://www.snapeda.com/parts/500ASSP1M2QE/E-Switch/view-part/?ref=eda, MF=E-Switch, MP=500ASSP1M2QE, Price=None, Purchase-URL=https://pricing.snapeda.com/search/part/500ASSP1M2QE/?ref=eda, SnapEDA_Link=https://www.snapeda.com/parts/500ASSP1M2QE/E-Switch/view-part/?ref=snap
SW1: library part SW_KSR223GLFG-SMD, "Tactile Switch SPST-NO Top Actuated Surface Mount", Case/Package=SMD, Manufacturer=C&K, Manufacturing Part Number=KSR223GLFG, Supplier Part Number-1=401-1704-1-ND, Supplier-1=Digikey
U1: library part CMP-1773-00001-1, "Driver IC for Dual DC Motor, 15 V, -20 to 85 degC, 24-Pin SSOP, RoHS, Tape and Reel", Case\Package=TO-236-3, Forward Current="70 mA", Forward Voltage="1 V", Max Operating Temperature="125 degC", Max Power Dissipation="200 mW", Max Surge Current="100 mA", Min Operating Temperature="-55 degC", Package Quantity=3000, Peak Reverse Current="0.1 uA", ComponentLink1Description="Manufacturer URL", ComponentLink1URL=http://www.toshiba.com/, ComponentLink2Description=Datasheet, ComponentLink2URL=https://toshiba.semicon-storage.com/info/docget.jsp?did=10660&prodName=TB6612FNG, DatasheetVersion=Oct-14, Element Configuration="Common Cathode", Elements=2, Height="1.1 mm", Length="3 mm", Mount="Surface Mount", PackageDescription="24-Pin Shrink Small Outline Package Integrated Circuit, Body 7.8 x 5.6 mm, Pitch 0.65 mm", PackageReference=SSOP-24, Packaging="Tape and Reel", Pins=3, Radiation Hardening=No, REACH SVHC="No SVHC", Recovery Time="5 ns", RoHSCompliant=true, Width="1.4 mm"
U2: library part "IC-STM32F103C8T6 _1", "ARM® Cortex®-M3 STM32F1 Microcontroller IC 32-Bit 72MHz 64KB (64K x 8) FLASH", Case/Package=48-LQFP, Manufacturer=STMicroelectronics, Supplier Part Number-1=497-6063-ND, Manufacturer Part Number=STM32F103C8T6, Supplier-1=Digikey
U3: "High Efficiency 1.2MHz2A Step Up Converter", Package=Package, Availability="Not in stock", Check_prices=https://www.snapeda.com/parts/MT3608/Aerosemi+Technology+Co.%252C+Ltd/view-part/?ref=eda, MF="Aerosemi Technology Co., Ltd", MP=MT3608, Price=None, SnapEDA_Link=https://www.snapeda.com/parts/MT3608/Aerosemi+Technology+Co.%252C+Ltd/view-part/?ref=snap
U4: "MPU-6050 series Accelerometer, Gyroscope, 3 Axis Sensor Evaluation Board", Package="QFN-24 InvenSense", Check_prices=https://www.snapeda.com/parts/MPU-6050/TDK+InvenSense/view-part/?ref=eda, MF="TDK InvenSense", MP=MPU-6050, SnapEDA_Link=https://www.snapeda.com/parts/MPU-6050/TDK+InvenSense/view-part/?ref=snap
Y1: library part "XTAL_32.768KHz-MC-405 32.7680K-G3", "Crystals SMD AT XTL MHZ +/-50PPM 12.5 PF 250 T/R", Case/Package=SMD, Manufacturer=Epson, Manufacturing Part Number="MC-405 32.7680K-G3: ROHS", Supplier Part Number-1=732-MC405327680KG3RS, Supplier-1=Mouser
Y2: library part XTAL_8MHZ-LFXTAL030234, "Crystals 8MHz 22pF -20C 70C", Case/Package=SMD, Manufacturer="IQD Frequency Products", Manufacturing Part Number=LFXTAL030234Reel, Supplier Part Number-1=449-LFXTAL030234REEL, Supplier-1=Mouser

## Free pads (board coordinates)
  round 1.28 hole 1.28: 2(10.96,27.85) 2(10.983,9.501) 2(69.606,27.85) 2(69.629,9.501)

## Via types
v1: diameter 1.27, hole 0.711, Top Layer to Bottom Layer, 57 vias
v2: diameter 1.016, hole 0.508, Top Layer to Bottom Layer, 37 vias
v3: diameter 0.61, hole 0.305, Top Layer to Bottom Layer, 5 vias

## Nets (pads, with @x,y where several pads share a name; then routed paths per layer and width w, separated by ;. In a path a pad name is that pad's centre, name@x,y a point inside that pad or via, vN(x,y) a via of type N, cw(c..) or ccw(c..) an arc to the next point about the centre after c; other vN are vias at no path point)
3.7V: J12.1 L1.2 S1.2 U3.5 | length 141.9
  Top Layer w0.5: S1.2@6.731,-6.223 7.984,-6.223 9,-5.207 9,1.761 13.462,6.223 v1(26.67,6.223) ; v1(31.242,6.35) 35.306,10.414 v1(42.938,10.414) v1@43.002,10.414 ; v1(45.72,10.287) 64.897,10.287 v1(65.024,10.414) ; 52.832,36.864 52.832,34.671 v1(52.959,34.544) ; U3.5@52.832,38.565 52.787,38.52 52.787,36.864 52.299,36.376 51.465,36.376 49.047,38.794 49.047,41.147 53.252,45.352 54.251,45.352 54.801,45.902 L1.2@54.801,46.609 ; v1(66.675,-2.413) 72.768,-2.413 J12.1@75.455,-5.1
  Bottom Layer w0.5: v1(26.67,6.223) 26.733,6.286 31.178,6.286 v1(31.242,6.35) ; v1(42.938,10.414) 43.002,10.351 45.657,10.351 v1(45.72,10.287) ; v1(52.959,34.544) 52.959,22.479 v1(65.024,10.414) 65.151,10.414 66.47,9.095 66.47,-1.735 66.528,-1.793 66.528,-2.266 v1(66.675,-2.413)
5+v: C4.2 C6.1 C7.2 C20.1 D2.1 J2.02 J3.02 J4.02 J7.01 J8.01 J9.01 J10.01 J11.01 Q1.2 R10.2 R14.2 R15.1 R15.2 U1.20 | length 284.8
  Top Layer w0.5: J7.01@10.414,50.292 10.534,50.412 10.534,51.434 15.488,56.388 J8.01@26.289,56.388 45.085,56.388 J9.01@46.355,55.118 ; v1(15.217,22.489) 33.607,22.489 36.391,25.273 ; U1.20@32.909,50.945 31.754,52.1 29.5,52.1 28.249,50.849 v1(28.249,47.787) 28.249,47.059 27.239,46.049 Q1.2@27.239,45.42 27.239,44.791 28.9,43.13 28.9,32.764 36.391,25.273 ; U1.20@32.934,50.182 32.959,50.207 32.959,50.945 32.959,51.859 33.8,52.7 37.7,52.7 C4.2@41.15,49.25 ; C7.2@40.9,45.325 41.125,45.1 C7.2@41.373,45.1 ; C4.2@40.921,49.021 C4.2@41.15,49.25 ; C4.2@41.188,49.024 41.188,48.804 41.196,48.796 41.678,48.796 41.971,48.503 41.971,45.698 C7.2@41.373,45.1 ; J3.02@42.037,25.273 J4.02@38.354,25.273 36.391,25.273 ; C6.1@43.339,45.583 43.822,45.1 47.5,45.1 48.768,46.368 48.768,50.38 49.061,50.673 56.752,50.673 61.49,45.935 62.304,45.935 ; C6.1@43.8,45.1 C7.2@41.373,45.1 ; v1(45.2,50.3) 42.2,50.3 C4.2@41.15,49.25 ; J10.01@62.32,47.408 62.32,45.951 62.304,45.935 ; R14.2@62.8,-15.45 63.05,-15.3 v1(63.82,-13.396) ; J11.01@67.4,38.18 67.55,38.03 R15.2@67.55,35.3 ; v1(69.075,34.297) 68.927,34.444 68.306,34.444 67.55,35.2 R15.2@67.55,35.3 ; 62.304,45.935 63.879,45.935 64.601,45.213 R10.2@64.601,43.561 64.451,43.411 64.451,43.081 62.75,41.38 62.75,39.94 D2.1@62.21,39.4 62.21,39.306 62.82,38.696 C20.1@64.496,38.696 64.744,38.696 64.844,38.596 64.844,37.983 65.945,36.882 65.945,35.405 R15.1@66.05,35.3 R15.2@67.55,35.3
  Bottom Layer w0.5: J7.01@10.414,50.292 10.422,50.3 16.327,50.3 19.427,47.2 27.571,47.2 28.158,47.787 v1(28.249,47.787) ; v1(15.217,22.489) 15.1,22.372 15.1,14.4 17.272,12.228 J2.02@17.272,3.391 ; v1(45.2,50.3) 45.2,53.963 J9.01@46.355,55.118 ; v1(63.82,-13.396) 64.956,-14.531 72.308,-14.531 72.601,-14.239 72.601,-6.101 67.6,-1.1 67.6,32.822 v1(69.075,34.297)